# Altium PCB MainBoardPCB_4.PcbDoc (part 30 of 32)
Units mm, origin at the board's own origin, x right, y up, seen from the top; angles counter-clockwise.
Board outline 333.63 x 349.38 mm, 16 copper layers (L1, L2 (GND), L3 (Sign), L4 (GND), L5 (Sign), L6 (PWR/GND), L7(PWR/GND), L8 (Plane_GND), L9 (PWR/GND), L10 (PWR/GND), L11 (PWR/GND), L12 (Sign), L13 (GND), L14 (Sign), L15 (GND), L16), stack 2.502 mm thick; 2205 components, 1648 nets, 8314 pads, 3172 vias.
Unrouted connection lines stored in the file: 5141.
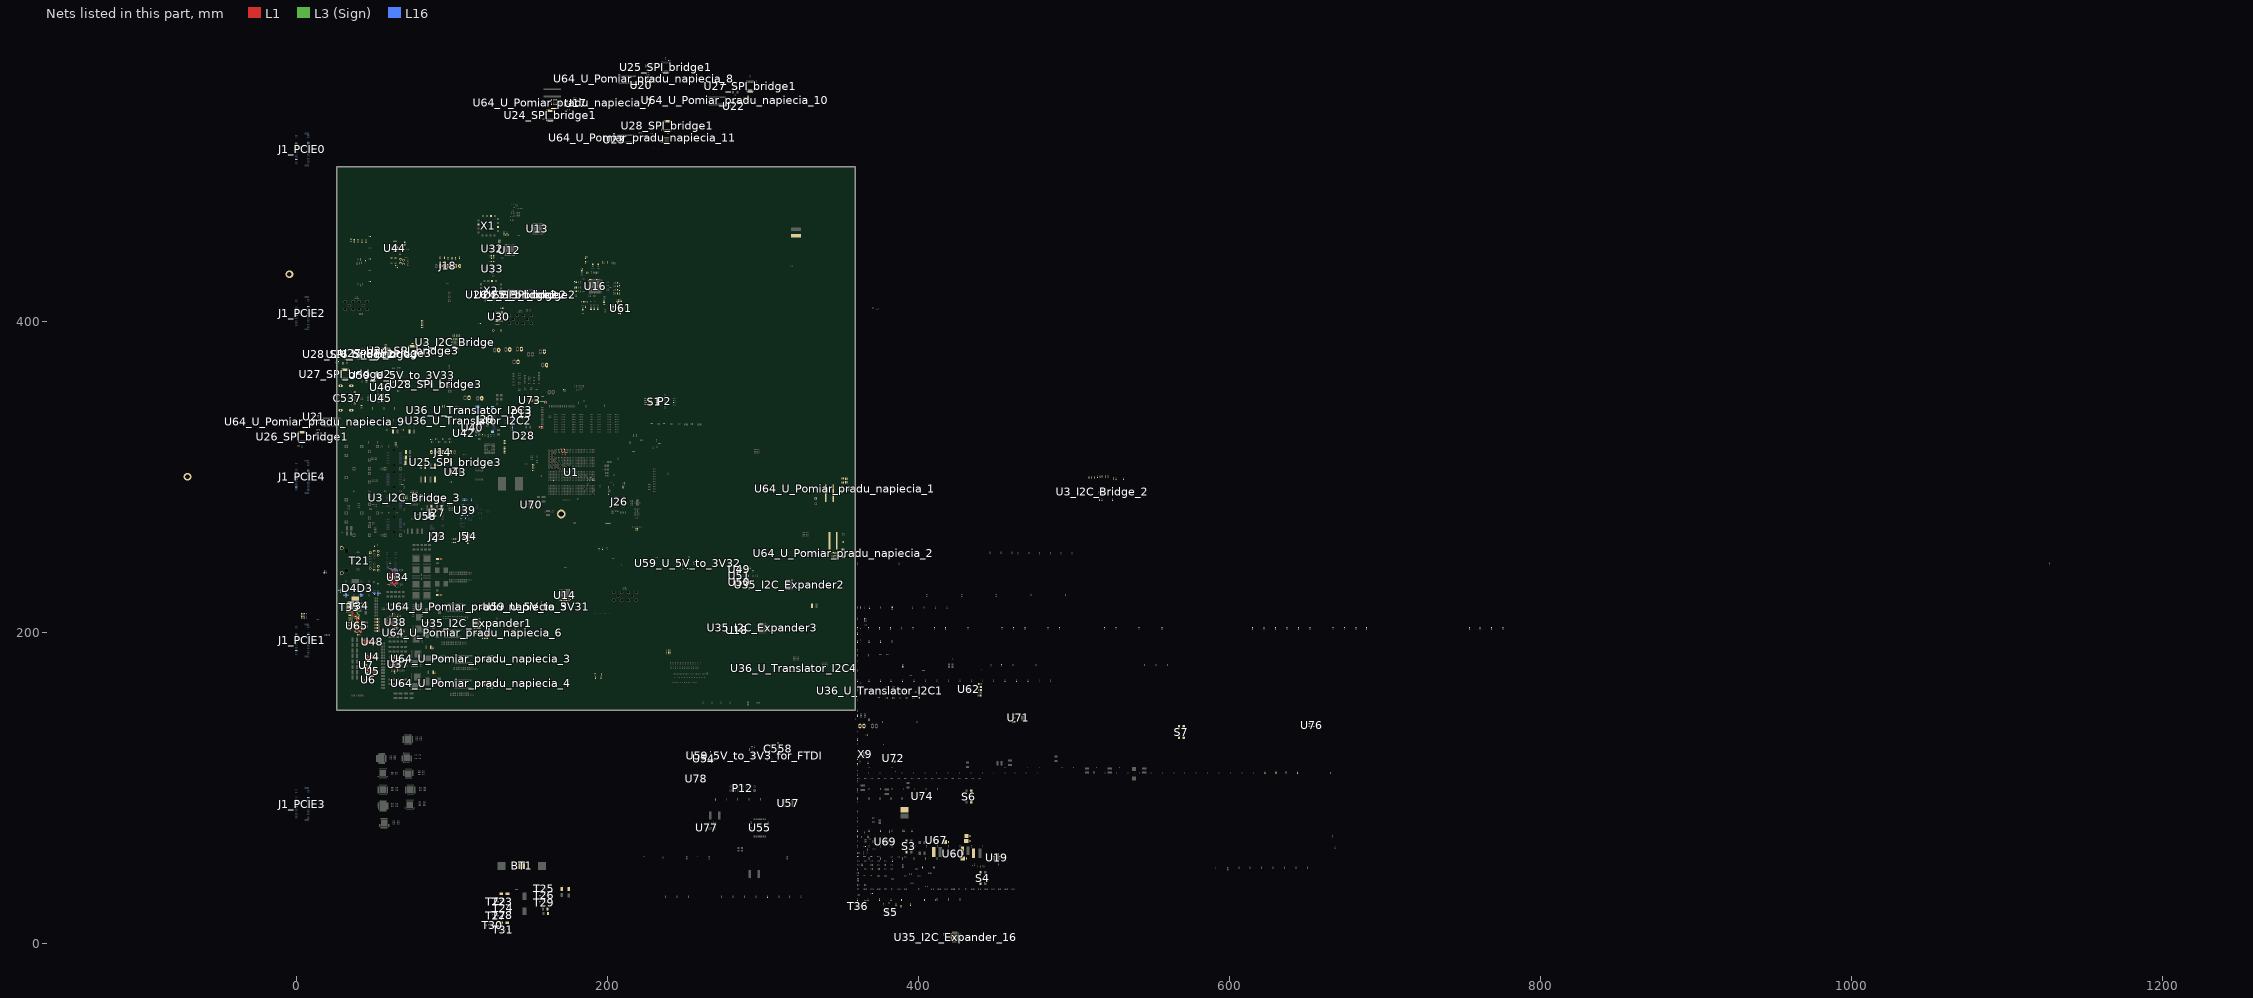
[diagram p30: the nets of this part, all layers, seen from the top]

## Via types
v1: diameter 0.5, hole 0.2, L1 to L16, tented both sides, 1153 vias
v2: diameter 0.5/0.35/0.35/0.35/0.35/0.35/0.35/0.35/0.35/0.35/0.35/0.35/0.35/0.35/0.35/0.5 (per signal layer), hole 0.2, L1 to L16, tented both sides, 548 vias
v3: diameter 0.5, hole 0.2, L1 to L16, 522 vias
v4: diameter 0.5/0.35/0.35/0.35/0.35/0.35/0.35/0.35/0.35/0.35/0.35/0.35/0.35/0.35/0.35/0.5 (per signal layer), hole 0.15, L1 to L16, tented both sides, 266 vias
v5: diameter 0.8, hole 0.4, L1 to L16, tented both sides, 164 vias
v6: diameter 0.35/0/0.35 (per signal layer), hole 0.127, L1 to L3 (Sign), tented both sides, 132 vias
v7: diameter 2.54, hole 1.02, L1 to L16, 125 vias
v8: diameter 1.4, hole 0.5, L1 to L16, tented both sides, 80 vias
v9: diameter 0.35, hole 0.127, L1 to L2 (GND), tented both sides, 36 vias
v10: diameter 0.4, hole 0.2, L1 to L16, 16 vias
v11: diameter 0.25, hole 0.2, L1 to L16, 16 vias
v12: diameter 5, hole 3, L1 to L16, 15 vias
v13: diameter 0.3, hole 0.2, L1 to L16, 15 vias
v14: diameter 0.45, hole 0.15, L1 to L16, 12 vias
v15: diameter 0.5/0.35/0.35/0.35/0.35/0.35/0.35/0.35/0.35/0.35/0.35/0.35/0.35/0.35/0.35/0.45 (per signal layer), hole 0.15, L1 to L16, tented both sides, 10 vias
v16: diameter 0.2/0/0.2 (per signal layer), hole 0.1, L1 to L3 (Sign), tented both sides, 9 vias
v17: diameter 0.4, hole 0.1, L1 to L16, 7 vias
v18: diameter 0.5, hole 0.2, L3 (Sign) to L6 (PWR/GND), tented both sides, 6 vias
v19: diameter 1.65, hole 1.65, L1 to L16, 6 vias
v20: diameter 1.15, hole 1.15, L1 to L16, 6 vias
v21: diameter 0.35/0/0.35 (per signal layer), hole 0.127, L14 (Sign) to L16, tented both sides, 5 vias
v22: diameter 0.2, hole 0.1, L1 to L16, 4 vias
v23: diameter 0.4, hole 0.2, L1 to L16, tented both sides, 2 vias
v24: diameter 0.4, hole 0.15, L1 to L16, 2 vias
v25: diameter 0.508, hole 0.127, L1 to L2 (GND), 2 vias
v26: diameter 0.508, hole 0.127, L2 (GND) to L3 (Sign), 2 vias
v27: diameter 0.5/0.35/0.35/0.35/0.35/0.35/0.35/0.35/0.35/0.35/0.35/0.35/0.35/0.35/0.35/0.5 (per signal layer), hole 0.15, L1 to L16, 2 vias
v28: diameter 0.35, hole 0.127, L3 (Sign) to L6 (PWR/GND), tented both sides, 2 vias
v29: diameter 5.5, hole 3.5, L1 to L16, 1 vias
v30: diameter 0.5/0.35/0.35/0.35/0.35/0.35/0.35/0.35/0.35/0.35/0.35/0.35/0.35/0.35/0.35/0.5 (per signal layer), hole 0.2, L1 to L16, 1 vias
v31: diameter 0.35/0.35/0.35 (per signal layer), hole 0.127, L1 to L3 (Sign), tented both sides, 1 vias
v32: diameter 0.45/0/0.45 (per signal layer), hole 0.15, L1 to L3 (Sign), tented both sides, 1 vias
v33: diameter 0.45/0/0.45 (per signal layer), hole 0.2, L14 (Sign) to L16, tented both sides, 1 vias
v34: diameter 0.35, hole 0.127, L2 (GND) to L3 (Sign), 1 vias
v35: diameter 0.35, hole 0.127, L1 to L2 (GND), 1 vias

## Nets (pads, with @x,y where several pads share a name; then routed paths per layer and width w, separated by ;. In a path a pad name is that pad's centre, name@x,y a point inside that pad or via, vN(x,y) a via of type N, cw(c..) or ccw(c..) an arc to the next point about the centre after c; other vN are vias at no path point) (continued)
Interrupt20: R735.2 U1.AD5 U64_U_Pomiar_pradu_napiecia_11.3
  other v2: 185.397,292.539
LED_0: R329.1 U39.47
LED_0_RJ: R329.2 T21.17
LED_1: R330.1 U39.46
LED_1_RJ: R330.2 T21.18
LED_2: R331.1 U39.45
LED_2_RJ: R331.2 T21.19
LED_3: R332.2 U39.39
LED_3_RJ: R332.1 T21.20
Logic_Out_KEY: R649.2 T26.3
LTC6952_1_CP_Out: C46.2 R77.2 U12.43 X1.2
LTC6952_1_REF_N: C53.1 R81.2 U12.46
LTC6952_1_REF_P: C54.1 R81.1 U12.45
LTC6952_1_Temp: R607.2 U12.49
LTC6952_1_VCO_N: C334.2 R532.2 U12.38
LTC6952_1_VCO_P: R533.1 U12.37
LTC6952_2_REF_N: C42.2 U13.46
LTC6952_2_REF_P: C41.2 U13.45
LTC6952_2_REF_SMA_N: C42.1 J3.2 R75.1
LTC6952_2_REF_SMA_P: C41.1 J2.2 R75.2
LTC6952_2_Temp: R736.2 U13.49
LTC6952_3_REF_N: C44.2 U14.46
LTC6952_3_REF_P: C43.2 U14.45
LTC6952_3_REF_SMA_N: C44.1 J5.2 R76.1
LTC6952_3_REF_SMA_P: C43.1 J4.2 R76.2
LTC6952_3_Temp: R765.2 U14.49
MDC: U39.16
MDIO: R333.2 U39.17
MIO_0: R768.2 U1.H17
  other v2: 169.397,304.539
MIO_1: R769.2
MIO_2: R770.2 U1.A20
  other v2: 162.397,307.539
MIO_3: R771.2 U1.D19
  other v2: 165.397,306.539
MIO_4: R772.2 U1.J17
  other v2: 170.397,304.539
MIO_5: R773.2 U1.C19
  other v2: 164.397,306.539
MIO_6: R774.2 U1.D20
  other v2: 165.397,307.539
MIO_7: R775.2 U1.E19
  other v2: 166.397,306.539
MIO_8: R776.2 U1.E20
  other v2: 166.397,307.539
MIO_9: R777.2 U1.F20
  other v2: 167.397,307.539
MIO_10: R778.2 U1.F18
  other v2: 167.397,305.539
MIO_11: R779.2 U1.G18
  other v2: 168.397,305.539
MIO_12: R780.2 U1.H18
  other v2: 169.397,305.539
MIO_13: R87.1 U1.G19
  other v2: 168.397,306.539
MIO_14: R88.1 U1.E18
  other v2: 166.397,305.539
MIO_15: R89.1 U1.J19
  other v2: 170.397,306.539
MIO_16: R90.1 U1.K17
  other v2: 171.397,304.539
MIO_17: R91.1 U1.C18
  other v2: 164.397,305.539
MIO_18: R92.1 U1.K18
  other v2: 171.397,305.539
MIO_19: R93.1 U1.K16
  other v2: 171.397,303.539
MIO_20: R94.1
MIO_21: R95.1 U1.H19
  other v2: 169.397,306.539
MIO_22: R96.1 U1.F17
  other v2: 167.397,304.539
MIO_23: R781.2 U1.K19
  other v2: 171.397,306.539
MIO_24: R782.2 U1.A18
  other v2: 162.397,305.539
MIO_25: R783.2 U1.B18
  other v2: 163.397,305.539
MIO_26: R784.2 U1.B20
  other v2: 163.397,307.539
MIO_27: R785.2 U1.B21
  other v2: 163.397,308.539
MIO_28: R786.2 U1.A21
  other v2: 162.397,308.539
MIO_29: R787.2 U1.D21
  other v2: 165.397,308.539
MIO_30: R788.2 U1.C21
  other v2: 164.397,308.539
MIO_31: R789.2 U1.A22
  other v2: 162.397,309.539
MIO_32: R790.2 U1.G20
  other v2: 168.397,307.539
MIO_33: R791.2 U1.C22
  other v2: 164.397,309.539
MIO_34: R792.2 U1.B24
  other v2: 163.397,311.539
MIO_35: R793.2 U1.B23
  other v2: 163.397,310.539
MIO_36: R794.2 U1.D22
  other v2: 165.397,309.539
MIO_37: R795.2 U1.F21
  other v2: 167.397,308.539
MIO_38: R796.2 U1.C23
  other v2: 164.397,310.539
MIO_39: R101.1 U1.E22
  other v2: 166.397,309.539
MIO_40: R102.1 U1.C24
  other v2: 164.397,311.539
MIO_41: R103.1 U1.D24
  other v2: 165.397,311.539
MIO_42: R104.1 U1.E23
  other v2: 166.397,310.539
MIO_43: R797.2 U1.F22
  other v2: 167.397,309.539
MIO_44: R798.2 U1.E24
  other v2: 166.397,311.539
MIO_45: R799.2 U1.F23
  other v2: 167.397,310.539
MIO_46: R105.1 U1.K20
  other v2: 171.397,307.539
MIO_47: R107.1 U1.K21
  other v2: 171.397,308.539
MIO_48: R108.1 U1.J21
  other v2: 170.397,308.539
MIO_49: R110.1 U1.G21
  other v2: 168.397,308.539
MIO_50: R111.1 U1.J20
  other v2: 170.397,307.539
MIO_51: R112.1 U1.H21
  other v2: 169.397,308.539
MIO_52: R362.1 U1.A24
  other v2: 162.397,311.539
MIO_53: R800.2 U1.B25
  other v2: 163.397,312.539
MIO_54: R115.1 U1.A23
  other v2: 162.397,310.539
MIO_55: R801.2 U1.B26
  other v2: 163.397,313.539
MIO_56: R116.1 U1.A25
  other v2: 162.397,312.539
MIO_57: R117.1 U1.A26
  other v2: 162.397,313.539
MIO_58: R118.1 U1.A28
  other v2: 162.397,315.539
MIO_59: R119.1 U1.A27
  other v2: 162.397,314.539
MIO_60: R120.1 U1.C26
  other v2: 164.397,313.539
MIO_61: R121.1 U1.B29
  other v2: 163.397,316.539
MIO_62: R122.1 U1.B28
  other v2: 163.397,315.539
MIO_63: R802.2 U1.A29
  other v2: 162.397,316.539
MIO_64: R803.2 U1.B30
  other v2: 163.397,317.539
MIO_65: R804.2 U1.D25
  other v2: 165.397,312.539
MIO_66: R805.2 U1.C27
  other v2: 164.397,314.539
MIO_67: R806.2 U1.C28
  other v2: 164.397,315.539
MIO_68: R807.2 U1.C29
  other v2: 164.397,316.539
MIO_69: R808.2 U1.D27
  other v2: 165.397,314.539
MIO_70: R809.2 U1.D26
  other v2: 165.397,313.539
MIO_71: R810.2 U1.D30
  other v2: 165.397,317.539
MIO_72: R811.2 U1.E27
  other v2: 166.397,314.539
MIO_73: R812.2 U1.E30
  other v2: 166.397,317.539
MIO_74: R813.2 U1.E29
  other v2: 166.397,316.539
MIO_75: R814.2 U1.D29
  other v2: 165.397,316.539
MIO_76: R815.2 U1.E28
  other v2: 166.397,315.539
MIO_77: R816.2 U1.E25
  other v2: 166.397,312.539
MIO_GPIO_0_12: J15.2 R780.1
MIO_GPIO_0_23: J16.2 R98.1 R781.1
MIO_GPIO_1_38: J17.2 R796.1
MIO_GPIO_2_66: J19.2 R805.1
MIO_GPIO_2_70: J20.2 R809.1
MIO_GPIO_2_73: J22.2 R812.1
MIO_GPIO_2_74: J23.2 R813.1 U36_U_Translator_I2C2.8
MIO_GPIO_2_75: J24.2 R814.1 U36_U_Translator_I2C3.8
MODE: R669.2 R670.1 U65.2 | length 3.6
  L1 w0.254: R670.1@37.668,200.838 38.26,200.838 ; U65.2@38.26,202.478 38.26,200.838 ; R669.2@38.887,199.931 38.537,199.931 38.26,200.208 38.26,200.838
NetBT1_2: BT1.2 R650.1 T22.2
NetC36_1: C36.1 R52.2 R54.2 | length 3.4
  L1 w0.5: R52.2@157.837,331.433 156.878,331.433 C36.1@156.346,331.965 156.903,332.522 R54.2@157.837,332.522
NetC45_2: C45.2 R77.1
NetC78_2: C78.2 U16.7
NetC79_2: C79.2 U16.38
NetC80_2: C80.2 U16.48
NetC91_1: C91.1 U16.39
NetC96_1: C96.1 U16.47
NetC207_2: C207.2 C208.1 L3.2
NetC209_2: C209.2 C210.1 L4.2
NetC211_2: C211.2 C212.1 L5.2
NetC213_2: C213.2 C214.1 L6.2
NetC215_2: C215.2 C216.1 L7.2
NetC217_2: C217.2 C218.1 L8.2
NetC277_2: C277.2
NetC278_2: C278.2
NetC289_2: C289.2
NetC290_2: C290.2
NetC301_2: C301.2
NetC302_2: C302.2
NetC320_1: C320.1 U30.9
NetC321_1: C321.1 U30.10
NetC322_2: C322.2 U30.3 X3.1
NetC323_2: C323.2 U30.2 X3.2
NetC334_1: C334.1 X1.10
NetC335_2: C335.2 R532.1 R533.2
NetC341_1: C341.1 J26.1
NetC351_2: C351.2 R268.2 U34.3 | length 4.2
  L1 w0.254: R268.2@59.692,237.714 60.97,237.714 61.118,237.565 61.118,236.791 C351.2@61.146,236.764 61.151,236.764 61.776,236.139 U34.3@62.822,236.139
NetC356_2: C356.2 R272.2 R277.1 R278.1 U34.2 U34.4 U34.7 U34.9 U34.32 | length 23.6
  L1 w0.254: U34.4@62.822,235.639 61.694,235.639 61.667,235.666 60.285,235.666 60.109,235.49 60.109,235.185 R272.2@60.156,235.139 60.206,235.139 60.479,234.866 60.479,234.745 60.783,234.441 60.783,233.982 60.926,233.839 C356.2@60.931,233.839 61.589,233.839 61.99,233.437 v17(62.009,233.437) 62.049,233.437 62.347,233.139 U34.9@63.322,233.139 ; U34.2@62.822,236.639 62.481,236.639 62.057,237.063 62.057,237.421 v17@62.125,237.489 ; U34.32@63.322,237.639 63.322,237.703 63.32,237.705 62.341,237.705 v17@62.125,237.489 ; R278.1@63.439,240.856 63.077,240.856 62.085,239.863 62.085,237.528 v17@62.125,237.489
  L16 w0.254: v17(62.085,237.489) 62.085,237.449 62.009,237.373 v17(62.009,233.437) 62.009,231.673 v22(64.365,229.317)
NetC357_2: C357.2 U34.13 U34.28 | length 10.4
  L1 w0.254: v22(64.511,231.163) 64.583,231.235 64.816,231.235 65.315,231.734 65.315,232.984 65.32,232.989 65.32,233.137 U34.13@65.322,233.139 ; U34.28@65.322,237.639 v17(65.322,238.22)
  L16 w0.254: v22(64.511,231.163) 64.949,231.601 64.949,237.847 v17(65.322,238.22)
NetC471_2: C471.2 T21.12
NetC472_2: C472.2 T21.6
NetC473_2: C473.2 T21.1
NetC474_2: C474.2 T21.7
NetC475_2: T21.S1
NetC476_2: T21.S2
NetC532_1: C532.1 U44.14
NetC533_1: C533.1 U44.15
NetC534_1: C534.1 U44.16
NetC537_1: C537.1 FB26.2
NetC537_4: C537.4 FB27.2
NetC537_Z1: C537.Z1 FB28.1
NetC549_2: C549.2 R687.1 | length 1.1
  L1 w0.254: C549.2@61.948,212.229 61.951,212.227 61.951,211.171 R687.1@61.953,211.169
NetC558_Z1: C558.Z1 C558.Z2
NetC568_2: C568.2 FB33.1 R433.2 U60.10 U60.11 U60.12 U60.13 U60.14
NetC571_1: C571.1 U60.7
NetC573_1: C573.1 R436.1 R437.2 U61.16
NetC577_1: C577.1 R438.1 R439.2 U61.10
NetC578_2: C578.2 U61.7
NetC579_2: C579.2 U61.19
NetC581_2: C581.2 C582.2 C583.2 FB34.2 R442.2 U62.1 U62.2 U62.3
NetC584_2: C584.2 R445.2 U62.7
NetC588_1: C588.1 R543.2
NetC588_2: C588.2 C589.1 R545.2
NetC591_2: C591.2 C592.2 FB37.2 X9.4
NetC597_2: C597.2 R140.1 U65.17 | length 3.4
  L1 w0.254: C597.2@34.722,206.35 34.722,205.41 R140.1@34.747,205.384 35.433,205.384 36,204.818 U65.17@36.92,204.818
NetC603_1: C603.1 R113.1 R114.2 U19.20
NetC604_1: C604.1 U19.25
NetC605_1: C605.1 R212.1 R214.2 U19.21
NetC612_1: C612.1 R216.2 R218.2 U19.22
NetC616_1: C616.1 R220.1 R274.2 U19.19
NetC633_2: C633.2 R613.1 | length 2.3
  L1 w0.254: R613.1@90.765,247.284 C633.2@93.052,247.284
NetC634_2: C634.2 R615.2 U34.11 U34.30 | length 14.8
  L1 w0.254: v17(61.056,231.693) 63.519,231.693 64.315,232.489 64.315,232.984 64.32,232.989 64.32,233.137 U34.11@64.322,233.139 ; v17(64.297,238.715) 64.32,238.692 U34.30@64.322,237.639 U34.30@64.322,237.639
  L16 w0.254: v17(61.056,231.693) R615.2@61.056,234.739 61.042,234.753 61.042,235.71 C634.2@61.028,235.724 61.028,235.729 61.301,236.002 61.392,236.002 61.525,236.135 61.525,237.705 62.535,238.715 v17(64.297,238.715)
NetC635_2: C635.2 R615.1 | length 1
  L16 w0.254: C635.2@60.062,235.724 60.109,235.677 60.109,234.785 R615.1@60.156,234.739
NetC636_2: C636.2 R616.1 | length 2.2
  L1 w0.254: R616.1@90.717,224.031 C636.2@92.942,224.031
NetC637_2: C637.2 R288.1 | length 1
  L1 w0.254: 87.033,189.468 87.568,189.468 C637.2@87.909,189.81
NetC638_2: C638.2 R298.1 | length 1.1
  L1 w0.254: 88.405,173.59 88.411,173.596 88.938,173.596 C638.2@89.332,173.99
NetC643_2: C643.2 R623.1 | length 1.1
  L1 w0.254: C643.2@63.12,173.949 R623.1@63.12,175.007
NetC644_2: C644.2 R624.1 | length 1
  L1 w0.254: R624.1@63.175,184.21 C644.2@63.175,185.176
NetC645_2: C645.2 R306.1 | length 0.9
  L1 w0.254: 87.566,203.543 87.564,203.54 87.564,203.257 C645.2@87.964,202.857
NetC646_2: C646.2 R316.1 | length 1.1
  L1 w0.254: C646.2@84.502,207.488 85.052,206.938 85.052,206.654
NetC649_2: C649.2
NetC651_2: C651.2
NetC652_2: C652.2 R631.1
NetC653_2: C653.2
NetC655_1: C655.1 U49.6
NetC656_1: C656.1 U50.6
NetC657_1: C657.1 U51.6
NetC674_2: C674.2 FB45.1 R644.2 U69.10 U69.11 U69.12 U69.13 U69.14
NetC677_2: C677.2
NetC678_2: C678.2 R652.2 R654.2 T25.1 T29.3
NetC679_2: C679.2 D22.1 D23.1
NetC680_2: C680.2 R656.1 R657.1 T30.1
NetC693_1: C693.1 L22.1 T34.1 T34.2 T34.3 T35.5 U65.12 | length 3.2
  L1 w0.254: U65.12@39.26,206.158 39.26,207.104 39.98,207.823 C693.1@39.98,209.037
NetC693_2: C693.2 D26.1 R665.1 | length 6.9
  L1 w0.254: R665.1@39.014,209.828 39.025,209.817 C693.2@39.98,209.817
  L1 w0.5: D26.1@34.353,210.921 35.856,210.921 36.25,211.315 38.427,211.315 39.014,210.728 R665.1@39.014,209.828
NetC701_1: C701.1 R667.2 | length 2.9
  L1 w0.254: C701.1@41.097,200.121 41.676,200.121 42.078,200.524 R667.2@42.078,202.265
NetC701_2: C701.2 C702.2 U65.5 | length 2.7
  L1 w0.254: U65.5@39.76,202.478 39.76,201.311 C702.2@40.17,200.901 C701.2@41.097,200.901
NetC703_2: C703.2 U65.7 | length 1.7
  L1 w0.254: U65.7@40.6,203.818 41.292,203.818 41.38,203.73 41.759,203.73 C703.2@42.127,204.097
NetC706_1: C706.1 R671.1 R672.2 U70.16
NetC710_1: C710.1 R673.1 R674.2 U70.10
NetC711_2: C711.2 U70.7
NetC712_2: C712.2 U70.19
NetC713_2: C713.2 U71.3 X1.14
NetC715_2: C715.2
NetC716_2: C716.2
NetC717_2: C717.2
NetC718_2: C718.2
NetC719_2: C719.2 U69.7
NetC724_1: C724.1 R384.1
NetC725_1: C725.1 R385.1
NetC726_1: C726.1 R484.1
  other v29: 170.471,276.121
NetC727_1: C727.1 R485.1
NetC790_1: C790.1 U76.3
NetD5_1: D5.1 R716.1
NetD5_2: D5.2 U43.14
NetD6_1: D6.1 R717.1
NetD6_2: D6.2 U43.13
NetD7_1: D7.1 R718.1
NetD7_2: D7.2 D9.2 U43.12
NetD8_1: D8.1 R719.1
NetD8_2: D8.2 U43.11
NetD9_1: D9.1 R720.1
NetD10_1: D10.1 R368.1
NetD10_2: D10.2 U44.12
NetD11_2: D11.2 R370.1 S4.1 S4.2 U44.7
NetD12_2: D12.2 R369.1 S3.1 S3.2 U44.6
NetD16_1: D16.1 L13.1 U19.5
NetD16_2: D16.2 U19.6
NetD17_1: D17.1 L16.1 U19.4
NetD17_2: D17.2 U19.3
NetD18_1: D18.1 L17.1 U19.2
NetD18_2: D18.2 U19.1
NetD19_1: D19.1 L18.1 U19.7
NetD19_2: D19.2 U19.8
NetD20_1: D20.1 D21.1 R647.1
NetD20_2: D20.2 T23.3
NetD21_2: D21.2 T27.3
NetD28_2: D28.2 R276.2
NetFB29_2: FB29.2 J28.10 J28.11 J28.12 J28.13
NetJ30_1: J30.1 R283.2
NetJ30_2: J30.2 R286.2
NetL15_2: L15.2 U19.24
NetP3_1: P3.1 U44.11
NetP4_2: P4.2 U44.10
NetP12_13: P12.13 R730.1 U78.1
NetP13_1: P13.1 R675.2
NetP13_3: P13.3 R737.1
NetR3_I2C_Bridge_1: R3_I2C_Bridge.1 U3_I2C_Bridge.17
NetR3_I2C_Bridge_2_1: R3_I2C_Bridge_2.1 U3_I2C_Bridge_2.17
NetR3_I2C_Bridge_3_1: R3_I2C_Bridge_3.1 R176.1 R180.1 R185.1 R189.1 R194.1 R198.1 R203.1 R207.1 R213.1 R221.1 R538.1 U3_I2C_Bridge.19 U3_I2C_Bridge_3.17 U58.13 U64_U_Pomiar_pradu_napiecia_7.5 U64_U_Pomiar_pradu_napiecia_8.5 U64_U_Pomiar_pradu_napiecia_9.5 U64_U_Pomiar_pradu_napiecia_10.5 U64_U_Pomiar_pradu_napiecia_11.5
NetR4_I2C_Bridge_1: R4_I2C_Bridge.1 U3_I2C_Bridge.16
NetR4_I2C_Bridge_2_1: R4_I2C_Bridge_2.1 U3_I2C_Bridge_2.16
NetR4_I2C_Bridge_3_1: R4_I2C_Bridge_3.1 R177.1 R181.1 R186.1 R190.1 R195.1 R199.1 R204.1 R208.1 R215.1 R222.1 R427.1 U3_I2C_Bridge.20 U3_I2C_Bridge_3.16 U58.14 U64_U_Pomiar_pradu_napiecia_7.4 U64_U_Pomiar_pradu_napiecia_8.4 U64_U_Pomiar_pradu_napiecia_9.4 U64_U_Pomiar_pradu_napiecia_10.4 U64_U_Pomiar_pradu_napiecia_11.4
NetR5_I2C_Bridge_1: R5_I2C_Bridge.1 U3_I2C_Bridge.15
NetR5_I2C_Bridge_2_1: R5_I2C_Bridge_2.1 U3_I2C_Bridge_2.15
NetR5_I2C_Bridge_3_1: R5_I2C_Bridge_3.1 U3_I2C_Bridge_3.15 U35_I2C_Expander3.8
NetR6_I2C_Bridge_1: R6_I2C_Bridge.1 U3_I2C_Bridge.14
NetR6_I2C_Bridge_2_1: R6_I2C_Bridge_2.1 U3_I2C_Bridge_2.14
NetR6_I2C_Bridge_3_1: R6_I2C_Bridge_3.1 U3_I2C_Bridge_3.14 U35_I2C_Expander3.9
NetR7_I2C_Bridge_1: R7_I2C_Bridge.1 U3_I2C_Bridge.13
NetR7_I2C_Bridge_2_1: R7_I2C_Bridge_2.1 U3_I2C_Bridge_2.13
NetR7_I2C_Bridge_3_1: R7_I2C_Bridge_3.1 R130.1 U3_I2C_Bridge_3.13
NetR8_I2C_Bridge_1: R8_I2C_Bridge.1 U3_I2C_Bridge.12
NetR8_I2C_Bridge_2_1: R8_I2C_Bridge_2.1 U3_I2C_Bridge_2.12
NetR8_I2C_Bridge_3_1: R8_I2C_Bridge_3.1 R131.1 U3_I2C_Bridge_3.12
NetR9_I2C_Bridge_2_1: R9_I2C_Bridge_2.1 U3_I2C_Bridge_2.11
NetR9_I2C_Bridge_3_1: R9_I2C_Bridge_3.1 R22.1 R389.1 R457.1 R465.1 R563.1 R567.1 R571.1 R575.1 R579.1 R583.1 R587.1 R591.1 R593.1 R597.1 U3_I2C_Bridge_3.11 U35_I2C_Expander1.8 U35_I2C_Expander2.8 U64_U_Pomiar_pradu_napiecia_1.5 U64_U_Pomiar_pradu_napiecia_2.5 U64_U_Pomiar_pradu_napiecia_3.5 U64_U_Pomiar_pradu_napiecia_4.5 U64_U_Pomiar_pradu_napiecia_5.5 U64_U_Pomiar_pradu_napiecia_6.5 U72.5
NetR10_I2C_Bridge_2_1: R10_I2C_Bridge_2.1 U3_I2C_Bridge_2.10
NetR10_I2C_Bridge_3_1: R10_I2C_Bridge_3.1 R24.1 R390.1 R459.1 R466.1 R564.1 R568.1 R572.1 R576.1 R580.1 R584.1 R588.1 R592.1 R594.1 R598.1 U3_I2C_Bridge_3.10 U35_I2C_Expander1.9 U35_I2C_Expander2.9 U64_U_Pomiar_pradu_napiecia_1.4 U64_U_Pomiar_pradu_napiecia_2.4 U64_U_Pomiar_pradu_napiecia_3.4 U64_U_Pomiar_pradu_napiecia_4.4 U64_U_Pomiar_pradu_napiecia_5.4 U64_U_Pomiar_pradu_napiecia_6.4 U72.4
NetR12_1: R12.1 R19.2 U5.5 | length 4.2
  L1 w0.2: R19.2@44.801,174.289 R12.1@45.844,174.289 45.844,174.314 46.28,174.75 U5.5@47.56,174.75 46.345,174.75
NetR14_2: R14.2 R16.2 R22.2 R24.2 U72.2
NetR15_1: R15.1 R23.2 U4.5 | length 2.9
  L1 w0.2: R23.2@44.92,183.563 R15.1@45.94,183.563 45.94,183.667 46.345,184.071 U4.5@47.56,184.071
NetR17_1: R17.1 R25.2 U4.4 | length 2.9
  L1 w0.2: R25.2@44.92,185.074 R17.1@45.94,185.074 45.94,184.98 46.349,184.571 U4.4@47.56,184.571
NetR18_2: R18.2 U4.10 | length 1.4
  L1 w0.2: U4.10@49.86,184.071 50.307,184.071 50.707,184.471 R18.2@51.11,184.471
NetR20_1: R20.1 R26.2 U5.4 | length 4.2
  L1 w0.2: R26.2@44.801,175.686 R20.1@45.822,175.686 46.258,175.25 U5.4@47.56,175.25 46.349,175.25
NetR21_2: R21.2 U5.10 | length 1.9
  L1 w0.2: U5.10@49.86,174.75 50.762,174.75 51.138,175.125 R21.2@51.6,175.125
NetR27_2: R27.2 U6.C1
NetR28_2: R28.2 U7.C1
NetR149_1: R149.1 R159.2 U65.20 | length 2.2
  L1 w0.254: R159.2@34.773,203.149 35.891,203.149 36.059,203.318 U65.20@36.92,203.318
NetR150_1: R150.1 R160.2 U65.6 | length 8.3
  L1 w0.254: U65.6@40.6,203.318 41.282,203.318 ; v6(41.123,202.654) 41.282,202.814 41.282,203.318 ; R160.2@42.078,203.203 41.397,203.203 41.282,203.318 ; R150.1@42.202,206.468 v6(42.202,207.35)
  L3 (Sign) w0.254: v6(41.123,202.654) 42.202,203.733 v6(42.202,207.35)
NetR174_2: R174.2 R175.2 R176.2 R177.2 U64_U_Pomiar_pradu_napiecia_7.2
NetR178_2: R178.2 R179.2 R180.2 R181.2 U64_U_Pomiar_pradu_napiecia_7.1
NetR182_2: R182.2 U17.C1
NetR183_2: R183.2 R184.2 R185.2 R186.2 U64_U_Pomiar_pradu_napiecia_8.2
NetR187_2: R187.2 R188.2 R189.2 R190.2 U64_U_Pomiar_pradu_napiecia_8.1
NetR191_2: R191.2 U20.C1
NetR192_2: R192.2 R193.2 R194.2 R195.2 U64_U_Pomiar_pradu_napiecia_9.2
NetR196_2: R196.2 R197.2 R198.2 R199.2 U64_U_Pomiar_pradu_napiecia_9.1
NetR200_2: R200.2 U21.C1
NetR201_2: R201.2 R202.2 R203.2 R204.2 U64_U_Pomiar_pradu_napiecia_10.2
NetR205_2: R205.2 R206.2 R207.2 R208.2 U64_U_Pomiar_pradu_napiecia_10.1
NetR209_2: R209.2 U22.C1
NetR210_2: R210.2 R211.2 R213.2 R215.2 U64_U_Pomiar_pradu_napiecia_11.2
NetR217_2: R217.2 R219.2 R221.2 R222.2 U64_U_Pomiar_pradu_napiecia_11.1
NetR223_I2C_Bridge_2_1: R223_I2C_Bridge_2.1 U3_I2C_Bridge_2.8
NetR224_I2C_Bridge_2_1: R224_I2C_Bridge_2.1 U3_I2C_Bridge_2.7
NetR225_I2C_Bridge_2_1: R225_I2C_Bridge_2.1 U3_I2C_Bridge_2.6
NetR226_I2C_Bridge_2_1: R226_I2C_Bridge_2.1 U3_I2C_Bridge_2.5
NetR227_I2C_Bridge_2_1: R227_I2C_Bridge_2.1 U3_I2C_Bridge_2.4 U35_I2C_Expander_16.8
NetR228_2: R228.2 U23.C1
NetR229_2: R229.2 R230.2 R457.2 R459.2 U64_U_Pomiar_pradu_napiecia_1.2
NetR231_SPI_bridge3_1: R231_SPI_bridge3.1 U24_SPI_bridge3.11
NetR231_SPI_bridge3_2: R231_SPI_bridge3.2 U24_SPI_bridge3.15
NetR232_SPI_bridge1_2: R232_SPI_bridge1.2 U24_SPI_bridge1.9
NetR232_SPI_bridge2_2: R232_SPI_bridge2.2 U24_SPI_bridge2.9
NetR232_SPI_bridge3_2: R232_SPI_bridge3.2 U24_SPI_bridge3.9
NetR233_SPI_bridge3_1: R233_SPI_bridge3.1 U24_SPI_bridge1.6 U25_SPI_bridge1.6 U25_SPI_bridge3.11 U26_SPI_bridge1.6 U27_SPI_bridge1.6 U28_SPI_bridge1.6
NetR234_SPI_bridge1_2: R234_SPI_bridge1.2 U25_SPI_bridge1.9
NetR234_SPI_bridge2_2: R234_SPI_bridge2.2 U25_SPI_bridge2.9
NetR234_SPI_bridge3_2: R234_SPI_bridge3.2 U25_SPI_bridge3.9
NetR235_SPI_bridge1_1: R235_SPI_bridge1.1 U26_SPI_bridge1.9
NetR235_SPI_bridge2_1: R235_SPI_bridge2.1 U26_SPI_bridge2.9
NetR235_SPI_bridge3_1: R235_SPI_bridge3.1 U26_SPI_bridge3.9
NetR237_SPI_bridge1_1: R237_SPI_bridge1.1 U27_SPI_bridge1.9
NetR237_SPI_bridge2_1: R237_SPI_bridge2.1 U27_SPI_bridge2.9
NetR237_SPI_bridge3_1: R237_SPI_bridge3.1 U27_SPI_bridge3.9
NetR238_SPI_bridge2_1: R238_SPI_bridge2.1 U27_SPI_bridge2.11
NetR238_SPI_bridge2_2: R238_SPI_bridge2.2 U27_SPI_bridge2.15
NetR238_SPI_bridge3_1: R238_SPI_bridge3.1 U27_SPI_bridge3.11
NetR238_SPI_bridge3_2: R238_SPI_bridge3.2 U27_SPI_bridge3.15
NetR239_SPI_bridge1_2: R239_SPI_bridge1.2 U28_SPI_bridge1.9
NetR239_SPI_bridge2_2: R239_SPI_bridge2.2 U28_SPI_bridge2.9
NetR239_SPI_bridge3_2: R239_SPI_bridge3.2 U28_SPI_bridge3.9
NetR240_SPI_bridge3_1: R240_SPI_bridge3.1 U28_SPI_bridge3.11
NetR240_SPI_bridge3_2: R240_SPI_bridge3.2 U28_SPI_bridge3.15
NetR241_1: R241.1 R242.1 U3_I2C_Bridge_2.22
NetR243_1: R243.1 R244.1 U3_I2C_Bridge_2.23
NetR263_2: R263.2 U33.16
NetR264_2: R264.2 U33.13
NetR265_2: R265.2 U33.15
NetR266_1: R266.1 R267.2 S5.1 S5.2 S5.3 S5.4
NetR269_2: R269.2 U18.C1
NetR272_1: R272.1 U34.5 | length 1.8
  L1 w0.254: R272.1@61.056,235.139 U34.5@62.822,235.139
NetR281_1: R281.1 R400.1 U3_I2C_Bridge_2.18
NetR284_2: R284.2 U19.17
NetR289_1: R289.1 U37.5 | length 1.4
  L1 w0.254: R289.1@61.781,179.317 U37.5@63.175,179.317
NetR293_2: R293.2 R294.2 U37.7 | length 2.4
  L1 w0.254: R294.2@61.781,177.317 R293.2@61.781,178.317 U37.7@63.175,178.317
NetR304_2: R304.2 R388.2 R389.2 R390.2 U72.1
NetR305_2: R305.2 U67.6
NetR307_1: R307.1 U38.5 | length 4.1
  L1 w0.254: R307.1@57.945,206.596 57.945,206.233 58.189,205.989 59.673,205.989 59.898,206.214 U38.5@61.453,206.214
NetR308_2: R308.2 U67.5
NetR309_2: R309.2 U67.4
NetR310_2: R310.2 R312.2 U38.7 | length 2.8
  L1 w0.254: R312.2@58.826,204.716 59.784,204.716 60.282,205.214 U38.7@61.453,205.214
NetR334_1: R334.1 U39.12
NetR339_1: R339.1 R341.2 U40.7
NetR342_1: R342.1 R344.2 U42.7
NetR358_1: R358.1 S1.8
NetR359_1: R359.1 S1.7
NetR360_1: R360.1 S1.6
NetR361_1: R361.1 S1.5
NetR366_2: R366.2 R498.1 R499.2 R692.2
NetR372_1: R372.1 R373.2 U44.2 U44.3
NetR379_2: R379.2 U45.24
NetR380_2: R380.2 U46.C1
NetR391_1: R391.1 R393.2 U49.7
  other v12: -69.975,300.045
NetR394_1: R394.1 R396.2 U50.7
NetR397_1: R397.1 R399.2 U51.7
NetR419_2: R419.2 R422.1 U54.1
NetR423_2: R423.2 U55.6
NetR424_2: R424.2 U55.14
NetR428_1: R428.1 U3_I2C_Bridge_2.20 U36_U_Translator_I2C1.5 U36_U_Translator_I2C2.5
  other v12: -4.475,430.276
NetR429_1: R429.1 U58.12
NetR430_5V_to_3V3_for_FTDI_1: R430_5V_to_3V3_for_FTDI.1 R432_5V_to_3V3_for_FTDI.2 U59_5V_to_3V3_for_FTDI.7
NetR430_U_5V_to_3V31_1: R430_U_5V_to_3V31.1 R432_U_5V_to_3V31.2 U59_U_5V_to_3V31.7
NetR430_U_5V_to_3V32_1: R430_U_5V_to_3V32.1 R432_U_5V_to_3V32.2 U59_U_5V_to_3V32.7
NetR430_U_5V_to_3V33_1: R430_U_5V_to_3V33.1 R432_U_5V_to_3V33.2 U59_U_5V_to_3V33.7
NetR431_5V_to_3V3_for_FTDI_1: R431_5V_to_3V3_for_FTDI.1 U59_5V_to_3V3_for_FTDI.5
NetR433_1: R433.1 R434.2 U60.9
NetR435_1: R435.1 R668.2 U69.4
NetR443_1: R443.1 R444.2 U62.6
NetR449_1: R449.1 R450.1 U3_I2C_Bridge.22
NetR451_1: R451.1 R452.1 U3_I2C_Bridge.23
NetR453_1: R453.1 R454.1 U3_I2C_Bridge.18
NetR455_1: R455.1 R456.1 U35_I2C_Expander1.13
NetR458_1: R458.1 R460.1 U35_I2C_Expander1.12
NetR461_2: R461.2 R463.2 R465.2 R466.2 U64_U_Pomiar_pradu_napiecia_1.1
NetR462_1: R462.1 R464.1 U35_I2C_Expander1.11
NetR467_2: R467.2 R468.2 R593.2 R594.2 U64_U_Pomiar_pradu_napiecia_2.2
NetR469_1: R469.1 R470.1 U3_I2C_Bridge_3.22
NetR471_1: R471.1 R472.1 U3_I2C_Bridge_3.23
NetR473_1: R473.1 R474.1 U3_I2C_Bridge_3.18
NetR475_1: R475.1 R476.1 U35_I2C_Expander3.13
NetR477_1: R477.1 R478.1 U35_I2C_Expander3.12
NetR479_1: R479.1 R480.1 U35_I2C_Expander3.11
NetR481_2: R481.2 U26_SPI_bridge3.13
NetR488_1: R488.1 T36.3 U32.2
NetR543_1: R543.1 X9.3
NetR544_1: R544.1 X9.1
NetR558_I2C_Bridge_2_1: R558_I2C_Bridge_2.1 U3_I2C_Bridge_2.3 U35_I2C_Expander_16.9
NetR561_2: R561.2 R562.2 R563.2 R564.2 U64_U_Pomiar_pradu_napiecia_3.2
NetR565_2: R565.2 R566.2 R567.2 R568.2 U64_U_Pomiar_pradu_napiecia_3.1
NetR569_2: R569.2 R570.2 R571.2 R572.2 U64_U_Pomiar_pradu_napiecia_4.2
NetR573_2: R573.2 R574.2 R575.2 R576.2 U64_U_Pomiar_pradu_napiecia_4.1
NetR577_2: R577.2 R578.2 R579.2 R580.2 U64_U_Pomiar_pradu_napiecia_5.2
NetR581_2: R581.2 R582.2 R583.2 R584.2 U64_U_Pomiar_pradu_napiecia_5.1
NetR585_2: R585.2 R586.2 R587.2 R588.2 U64_U_Pomiar_pradu_napiecia_6.2
NetR589_2: R589.2 R590.2 R591.2 R592.2 U64_U_Pomiar_pradu_napiecia_6.1
NetR595_2: R595.2 R596.2 R597.2 R598.2 U64_U_Pomiar_pradu_napiecia_2.1
NetR599_1: R599.1 U3_I2C_Bridge_2.19 U36_U_Translator_I2C1.6 U36_U_Translator_I2C2.6
NetR600_1: R600.1 R601.2 U58.1
NetR607_1: R607.1 U1.AA13
  other v2: 182.397,300.539
NetR612_1: R612.1 U34.29 | length 8.5
  L1 w0.254: U34.29@64.822,237.639 64.822,237.71 64.831,237.72 v22(64.831,239.097)
  L16 w0.254: v22(59.917,241.89) 59.917,241.114 60.285,240.746 60.915,240.746 61.483,240.178 64.683,240.178 64.831,240.029 v22(64.831,239.097)
NetR614_1: R614.1 U34.12 | length 6.9
  L1 w0.254: R614.1@59.692,230.712 63.088,230.712 64.11,231.734 64.666,231.734 64.815,231.882 64.815,232.984 64.82,232.989 64.82,233.137 U34.12@64.822,233.139
NetR621_1: R621.1 U37.29 | length 1.6
  L1 w0.254: R621.1@65.137,183.369 65.116,183.348 65.116,182.714 65.175,182.655 U37.29@65.175,181.817
NetR622_1: R622.1 U37.12 | length 1.4
  L1 w0.254: R622.1@65.175,175.893 U37.12@65.175,177.317
NetR628_1: R628.1 U38.12 | length 3
  L1 w0.254: v6(63.453,203.556) U38.12@63.453,204.214 ; R628.1@69.132,200.683 v6(69.132,201.631)
  L3 (Sign) w0.254: v6(63.453,203.556) 63.458,203.556 64.457,202.557
NetR644_1: R644.1 R645.2 U69.9
NetR648_2: R648.2 T25.3
NetR650_2: R650.2 T23.1 T24.3
NetR651_1: R651.1 T27.1 T28.3
NetR653_2: R653.2 T30.3
NetR655_1: R655.1 T29.1
NetR657_2: R657.2 T31.3
NetR658_1: R658.1 T31.1
NetR665_2: R665.2 U65.13 | length 2.9
  L1 w0.254: U65.13@38.76,206.158 38.76,207.602 39.014,207.856 R665.2@39.014,208.928
NetR677_1: R677.1 R682.2 U48.6 | length 2.9
  L1 w0.2: R677.1@44.716,192.933 R682.2@45.775,192.933 45.914,192.933 46.214,193.233 U48.6@47.527,193.233
NetR678_1: R678.1 R683.2 U48.5 | length 5.6
  L1 w0.2: R683.2@42.6,192.933 R678.1@43.658,192.933 43.658,193.501 43.89,193.733 U48.5@47.527,193.733
NetR679_1: R679.1 R684.2 U48.3 | length 2.9
  L1 w0.2: R684.2@44.716,195.033 R679.1@45.775,195.033 46.075,194.733 U48.3@47.527,194.733
NetR680_1: R680.1 R685.2 U48.4 | length 5.6
  L1 w0.2: R685.2@42.6,195.033 R680.1@43.658,195.033 43.658,194.466 43.89,194.233 U48.4@47.527,194.233
NetR681_2: R681.2 U48.10 | length 1.4
  L1 w0.2: U48.10@49.827,193.733 50.729,193.733 R681.2@51.105,194.109
NetR686_1: R686.1 U38.29 | length 0.6
  L1 w0.254: U38.29@63.453,208.714 v6@63.453,209.276
  other v6: 63.449,209.276
NetR689_2: R689.2 R690.2 U73.7 | length 10.7
  L1 w0.2: U73.7@151.644,349.484 153.033,349.484 v6(153.035,349.482)
  L1 w0.3: R690.2@159.652,348.062 160.213,348.062 ; v6(160.213,348.729) 160.213,348.062 ; R689.2@160.795,348.062 160.213,348.062
  L3 (Sign) w0.2: v6(153.035,349.482) v6@153.035,349.491
  L3 (Sign) w0.3: v6@153.035,349.491 153.797,348.729 v6(160.213,348.729)
NetR692_1: R692.1 S6.3 S6.4
NetR710_1: R710.1 R711.1 R712.2
NetR711_2: R711.2 U76.4
NetR713_1: R713.1 S7.1 S7.2
NetR714_2: R714.2 S7.3 S7.4
NetR736_1: R736.1 U1.AB13
  other v2: 183.397,300.539
NetR738_1: R738.1 R739.1 U35_I2C_Expander2.13
NetR740_1: R740.1 R741.1 U35_I2C_Expander2.12
NetR742_1: R742.1 R743.1 U35_I2C_Expander2.11
NetR753_1: R753.1 U3_I2C_Bridge.24
NetR754_1: R754.1 U35_I2C_Expander2.14
NetR758_1: R758.1 R759.1
NetR760_1: R760.1 R761.1
NetR762_1: R762.1 R763.1
NetR765_1: R765.1 U1.AE14
  other v2: 186.397,301.539
NetR766_1: R766.1 U1.AE13
  other v2: 186.397,300.539
NetR766_2: R766.2
NetR767_1: R767.1 U1.AC14
  other v2: 184.397,301.539
NetR767_2: R767.2
NetR768_1: R768.1
NetR769_1: R769.1
NetR770_1: R770.1
NetR771_1: R771.1
NetR836_2: R836.2 R838.1 U35_I2C_Expander_16.22
NetR837_2: R837.2 R840.1 U35_I2C_Expander_16.19
NetR839_2: R839.2 R841.1 U35_I2C_Expander_16.17
NetT22_3: T22.3 T23.2
NetT34_4: T34.4 U65.11 | length 14.6
  L1 w0.254: v6(37.846,218.796) 37.85,218.791 T34.4@38.377,218.791 ; U65.11@39.76,206.158 39.76,206.746 v6@40.514,207.5
  L3 (Sign) w0.254: v6(37.846,218.796) 37.846,213.779 40.526,211.099 v6(40.526,207.488)
NetT35_4: T35.4 U65.15 | length 8.6
  L1 w0.254: v6(36.36,212.471) T35.4@36.36,213.464 ; v6(36.71,206.368) 36.92,206.158 U65.15@37.76,206.158
  L3 (Sign) w0.254: v6(36.36,212.471) 36.093,212.204 36.093,206.985 v6(36.71,206.368)
NetTP7_I2C_Bridge_2_1: U3_I2C_Bridge_2.24
NetU1_AF11: U1.AF11
NetU1_AF12: U1.AF12
NetU1_AG11: U1.AG11
  other v2: 188.397,298.539
NetU1_AH11: U1.AH11
NetU1_AH12: U1.AH12
NetU1_AJ1: U1.AJ1
  other v2: 190.397,288.539
NetU1_AJ2: U1.AJ2
  other v2: 190.397,289.539
NetU1_AJ4: U1.AJ4
  other v2: 190.397,291.539
NetU1_AJ10: U1.AJ10
NetU1_AJ11: U1.AJ11
NetU1_AJ12: U1.AJ12
  other v2: 190.397,299.539
NetU1_AK4: U1.AK4
NetU1_AK10: U1.AK10
NetU1_AK11: U1.AK11
NetU1_D9: U1.D9
NetU1_D10: U1.D10
NetU1_G25: U1.G25
NetU1_G26: U1.G26
NetU1_G29: U1.G29
NetU1_G30: U1.G30
NetU1_H27: U1.H27
NetU1_H28: U1.H28
NetU1_J25: U1.J25
NetU1_J26: U1.J26
NetU3_I2C_Bridge_3_19: U3_I2C_Bridge_3.19 U36_U_Translator_I2C3.6 U36_U_Translator_I2C4.6
NetU3_I2C_Bridge_3_20: U3_I2C_Bridge_3.20 U36_U_Translator_I2C3.5 U36_U_Translator_I2C4.5
NetU24_SPI_bridge1_3: U24_SPI_bridge1.3 U25_SPI_bridge1.3 U25_SPI_bridge3.14 U26_SPI_bridge1.3 U27_SPI_bridge1.3 U28_SPI_bridge1.3
NetU24_SPI_bridge1_4: U24_SPI_bridge1.4 U25_SPI_bridge1.4 U25_SPI_bridge3.13 U26_SPI_bridge1.4 U27_SPI_bridge1.4 U28_SPI_bridge1.4
NetU24_SPI_bridge1_5: U24_SPI_bridge1.5 U25_SPI_bridge1.5 U25_SPI_bridge3.12 U26_SPI_bridge1.5 U27_SPI_bridge1.5 U28_SPI_bridge1.5
NetU24_SPI_bridge3_12: U24_SPI_bridge3.12
NetU24_SPI_bridge3_13: U24_SPI_bridge3.13
NetU24_SPI_bridge3_14: U24_SPI_bridge3.14
NetU27_SPI_bridge2_12: U27_SPI_bridge2.12
NetU27_SPI_bridge2_13: U27_SPI_bridge2.13
NetU27_SPI_bridge2_14: U27_SPI_bridge2.14
NetU27_SPI_bridge3_12: U27_SPI_bridge3.12
NetU27_SPI_bridge3_13: U27_SPI_bridge3.13
NetU27_SPI_bridge3_14: U27_SPI_bridge3.14
NetU28_SPI_bridge3_12: U28_SPI_bridge3.12
NetU28_SPI_bridge3_13: U28_SPI_bridge3.13
NetU28_SPI_bridge3_14: U28_SPI_bridge3.14
NetU35_I2C_Expander1_1: U35_I2C_Expander1.1
NetU35_I2C_Expander1_25: U35_I2C_Expander1.25
NetU35_I2C_Expander1_26: U35_I2C_Expander1.26
NetU35_I2C_Expander1_27: U35_I2C_Expander1.27
NetU35_I2C_Expander1_28: U35_I2C_Expander1.28
NetU35_I2C_Expander2_15: U35_I2C_Expander2.15
NetU35_I2C_Expander2_16: U35_I2C_Expander2.16
NetU35_I2C_Expander2_25: U35_I2C_Expander2.25
NetU35_I2C_Expander2_26: U35_I2C_Expander2.26
NetU35_I2C_Expander2_27: U35_I2C_Expander2.27
NetU35_I2C_Expander3_20: U35_I2C_Expander3.20
NetU35_I2C_Expander3_22: U35_I2C_Expander3.22
NetU35_I2C_Expander3_23: U35_I2C_Expander3.23
NetU35_I2C_Expander3_25: U35_I2C_Expander3.25
NetU35_I2C_Expander?_17: 
NetU35_I2C_Expander?_27: 
NetU35_I2C_Expander_10_27: 
NetU35_I2C_Expander_12_14: 
NetU35_I2C_Expander_12_26: 
NetU35_I2C_Expander_12_27: 
NetU35_I2C_Expander_13_2: 
NetU35_I2C_Expander_13_17: 
NetU35_I2C_Expander_13_18: 
NetU35_I2C_Expander_13_20: 
NetU35_I2C_Expander_13_26: 
NetU35_I2C_Expander_13_27: 
NetU35_I2C_Expander_14_17: 
NetU35_I2C_Expander_14_25: 
NetU35_I2C_Expander_14_26: 
NetU35_I2C_Expander_14_27: 
NetU35_I2C_Expander_15_4: 
NetU35_I2C_Expander_15_23: 
NetU35_I2C_Expander_15_24: 
NetU35_I2C_Expander_16_1: U35_I2C_Expander_16.1
NetU35_I2C_Expander_16_4: U35_I2C_Expander_16.4
NetU35_I2C_Expander_16_23: U35_I2C_Expander_16.23
NetU35_I2C_Expander_16_24: U35_I2C_Expander_16.24
NetU35_I2C_Expander_16_25: U35_I2C_Expander_16.25
NetU35_I2C_Expander_16_26: U35_I2C_Expander_16.26
NetU35_I2C_Expander_16_27: U35_I2C_Expander_16.27
NetU35_I2C_Expander_16_28: U35_I2C_Expander_16.28
NetU36_U_Translator_I2C1_8: U36_U_Translator_I2C1.8
NetU36_U_Translator_I2C4_8: U36_U_Translator_I2C4.8
NVME_C_RX_1_N: C718.1 U1.K28 | length 0.7
  L1 w0.116: U1.K28@171.397,315.539 v2(171.884,316.027)
NVME_C_RX_1_P: C717.1 U1.K27 | length 0.7
  L1 w0.116: U1.K27@171.397,314.539 v2(171.884,315.027)
NVME_C_RX_O_N: C677.1 U1.M28 | length 0.7
  L1 w0.116: 172.909,315.052 U1.M28@173.397,315.539
NVME_C_RX_O_P: C653.1 U1.M27 | length 0.7
  L1 w0.116: 172.909,314.052 U1.M27@173.397,314.539
NVME_C_TX_1_N: C716.1 U1.J30 | length 0.7
  L1 w0.116: v1(169.909,318.027) U1.J30@170.397,317.539
NVME_C_TX_1_P: C715.1 U1.J29 | length 0.7
  L1 w0.116: v1(169.909,317.027) U1.J29@170.397,316.539
NVME_C_TX_O_N: C651.1 U1.L30 | length 0.7
  L1 w0.116: v1(171.909,318.027) U1.L30@172.397,317.539
NVME_C_TX_O_P: C649.1 U1.L29 | length 0.7
  L1 w0.116: v1(171.909,317.027) U1.L29@172.397,316.539
NVMe_Rx_0_N: J27.47 R541.1
NVMe_Rx_0_P: J27.49 R541.2
NVMe_Rx_1_N: J27.35 R542.1
NVMe_Rx_1_P: J27.37 R542.2
NVMe_Tx_0_N: J27.41
NVMe_Tx_0_P: J27.43
NVMe_Tx_1_N: J27.29
NVMe_Tx_1_P: J27.31
OSC_500Out: C333.2 X2.10 | length 3.2
  L3 (Sign) w0.254: v25(198.844,270.281) v26(202.019,270.281)
  other v25: 202.019,270.281
  other v26: 198.844,270.281
Osc_in_Si53323_2_N: C343.2 R259.2 R261.2 R489.1 U32.6
Osc_in_Si53323_2_P: C342.2 R260.2 R262.2 R489.2 U32.7
OSC_Out_DIV_N: C343.1 R258.1 U33.11
OSC_Out_DIV_P: C342.1 R256.2 U33.10
PCIE0_CLK_N: J1_PCIE0.53
PCIE0_CLK_P: J1_PCIE0.55
PCIE0_En_DCDC: J1_PCIE0.36
PCIE0_Prsnt1: J1_PCIE0.12
PCIE0_Prsnt2: 
PCIE0_Reset: J1_PCIE0.32
PCIE0_SysRef_FPGA_N: U1.AG10
PCIE0_SysRef_FPGA_P: U1.AF10
PCIE0_SysRef_N: J1_PCIE0.52
PCIE0_SysRef_P: J1_PCIE0.50
PCIE1_CLK_N: J1_PCIE1.53
PCIE1_CLK_P: J1_PCIE1.55
PCIE1_En_DCDC: J1_PCIE1.36
PCIE1_Prsnt1: J1_PCIE1.12
PCIE1_Prsnt2: 
PCIE1_Reset: J1_PCIE1.32
PCIE1_SysRef_FPGA_N: U1.AK8
PCIE1_SysRef_FPGA_P: U1.AK9
PCIE1_SysRef_N: J1_PCIE1.52
PCIE1_SysRef_P: J1_PCIE1.50
PCIE2_CLK_N: J1_PCIE2.53 U14.6
PCIE2_CLK_P: J1_PCIE2.55 U14.7
PCIE2_En_DCDC: J1_PCIE2.36
PCIE2_Prsnt1: J1_PCIE2.12
PCIE2_Prsnt2: 
PCIE2_Reset: J1_PCIE2.32
PCIE2_SysRef_FPGA_N: U1.AJ9 U14.30
PCIE2_SysRef_FPGA_P: U1.AH9 U14.31
PCIE2_SysRef_N: J1_PCIE2.52 U14.3
PCIE2_SysRef_P: J1_PCIE2.50 U14.4
PCIE3_CLK_N: J1_PCIE3.53 U14.15
PCIE3_CLK_P: J1_PCIE3.55 U14.16
PCIE3_En_DCDC: J1_PCIE3.36
PCIE3_Prsnt1: J1_PCIE3.12
PCIE3_Prsnt2: 
PCIE3_Reset: J1_PCIE3.32
PCIE3_SysRef_FPGA_N: U1.AF7 U14.27
PCIE3_SysRef_FPGA_P: U1.AF8 U14.28
  other v2: 187.397,295.539
PCIE3_SysRef_N: J1_PCIE3.52 U14.9
PCIE3_SysRef_P: J1_PCIE3.50 U14.10
PCIE4_CLK_N: J1_PCIE4.53 U14.21
PCIE4_CLK_P: J1_PCIE4.55 U14.22
PCIE4_En_DCDC: J1_PCIE4.36
PCIE4_Prsnt1: J1_PCIE4.12
PCIE4_Prsnt2: 
PCIE4_Reset: J1_PCIE4.32
PCIE4_SysRef_FPGA_N: U1.AE8 U14.24
PCIE4_SysRef_FPGA_P: U1.AE9 U14.25
PCIE4_SysRef_N: J1_PCIE4.52 U14.18
PCIE4_SysRef_P: J1_PCIE4.50 U14.19
PCIe_Reset: R788.1
PDN: R498.2 U16.46
PDN_LMK05028: R499.1
PEDET: J27.61
PERST#: J27.50
PEwake: J27.54
PG1_1: R295.2 R836.1 R839.1 U37.27 | length 2
  L1 w0.254: U37.27@66.175,181.817 66.175,182.406 R295.2@67.169,183.4
PG1_2: R313.2 U38.27 | length 1.8
  L1 w0.254: U38.27@64.453,208.714 64.453,209.276 64.953,209.776 R313.2@64.953,210.304
PG1_TPS7A8801: R440.1 U35_I2C_Expander2.1 U61.17
PG2_2: R314.2 R837.1 U38.14 | length 1.6
  L1 w0.254: U38.14@64.453,204.214 64.455,204.212 64.455,203.6 64.623,203.432 R314.2@64.623,202.723
PG2_TPS7A8801: R441.1 U35_I2C_Expander2.28 U61.9
PG2_TPS7A8801_0V9: R676.1 U37.8 U70.9 U73.5
PG_1V0@1.5A: R834.2 U35_I2C_Expander_16.20 U51.5
PG_1V8@1.5A: R833.2 U35_I2C_Expander_16.21 U50.5
PG_2V5@1.5A: R392.1 U18.A2 U49.5
PG_48_20V: R835.2 U35_I2C_Expander_16.18 U65.19 | length 5
  L1 w0.254: 34.861,200.89 34.861,201.915 R835.2@34.847,201.93 v6(35.674,201.93) ; v6(35.671,203.818) U65.19@36.92,203.818
  L3 (Sign) w0.254: v6(35.671,203.818) 35.671,201.933 v6(35.674,201.93)
PG_DCDC_Low_curr: R832.2 U19.23 U35_I2C_Expander_16.3
PG_LT3042: R442.1 U62.4
PG_PS_LN_5V0_1: U35_I2C_Expander2.4
PG_PS_LTC6952_1: R431_U_5V_to_3V33.1 U35_I2C_Expander2.21 U59_U_5V_to_3V33.5
PG_PS_LTC6952_2: R431_U_5V_to_3V32.1 U35_I2C_Expander2.3 U59_U_5V_to_3V32.5
PG_PS_LTC6952_3: R431_U_5V_to_3V31.1 U35_I2C_Expander2.19 U59_U_5V_to_3V31.5
PG_VTT_RAM: R691.2 U35_I2C_Expander_16.2 U73.6
PGND: C595.1 C596.1 C597.1 C598.1 C694.1 C695.1 C696.1 C697.1 C698.1 C699.1 C700.1 C704.2 D3.2 D4.2 R324.1 R764.2 T35.1 T35.2 T35.3 U65.16 | length 33.5
  L1 w0.5: v1(32.55,212.65) T35.1@32.55,213.464 ; v1(33.82,212.65) T35.2@33.82,213.464 ; v1(35.09,212.65) T35.3@35.09,213.464 ; v1(37.032,210.162) C598.1@37.846,210.162 ; C699.1@51.994,200.664 v1(53.081,200.664) ; C699.1@51.994,201.387 v1(53.081,201.387) ; C696.1@51.994,202.554 v1(53.081,202.554) ; C696.1@51.994,203.278 v1(53.081,203.278) ; C697.1@51.994,204.444 v1(53.081,204.444) ; C697.1@51.994,205.168 v1(53.081,205.168) ; C695.1@51.994,206.335 v1(53.081,206.335) ; C695.1@51.994,207.059 v1(53.081,207.059) ; C698.1@51.994,208.225 v1(53.081,208.225) ; C698.1@51.994,208.949 v1(53.081,208.949)
  L16 w0.5: v5(27.345,227.151) C595.1@28.639,227.151 ; v5(28.639,225.857) C595.1@28.639,227.151 ; v5(29.932,227.151) C595.1@28.639,227.151 ; v5(30.586,223.896) D4.2@31.88,223.896 ; v5(31.88,222.602) D4.2@31.88,223.896 ; v5(31.88,225.19) D4.2@31.88,223.896 ; v5(33.174,223.896) D4.2@31.88,223.896 ; v5(40.454,223.832) D3.2@41.748,223.832 ; v5(41.748,222.539) D3.2@41.748,223.832 ; v5(41.748,225.126) D3.2@41.748,223.832 ; v5(43.041,223.832) D3.2@41.748,223.832 ; v5(48.998,225.107) R324.1@50.292,225.107 v5(50.292,223.813) ; v5(52.54,223.901) C596.1@52.54,225.195 v5(53.834,225.195)
PMU_GPI: J14.7 R784.1
PMU_GPI_1: J14.6 R785.1
PMU_GPI_2: J14.5 R786.1
PMU_GPI_3: J14.4 R787.1
PMU_GPI_5: J14.2 R789.1
PMU_GPO_0: J18.7 R790.1
PMU_GPO_1: J18.6 R791.1
PMU_GPO_2: J18.5 R792.1
PMU_GPO_3: J18.4 R793.1
PMU_GPO_4: J18.3 R794.1
PMU_GPO_5: J18.2 R795.1
Power1_In: P8.1 R448_U_Pomiar_pradu_napiecia_1.1 U64_U_Pomiar_pradu_napiecia_1.10
Power1_In_CM: R12.2 R448_U_Pomiar_pradu_napiecia_1.2 U5.7 U6.C3 U6.D3 U6.D4 U6.E3 U6.E4 U6.F3 U6.F4 U64_U_Pomiar_pradu_napiecia_1.8 U64_U_Pomiar_pradu_napiecia_1.9
  other v5: 46.94,171.336 47.599,172.073 46.939,172.838 48.188,172.838
  other v10: 48.36,174.6
Power2_In: P10.1 R448_U_Pomiar_pradu_napiecia_2.1 U64_U_Pomiar_pradu_napiecia_2.10
Power2_In_CM: R20.2 R448_U_Pomiar_pradu_napiecia_2.2 U5.2 U7.C3 U7.D3 U7.D4 U7.E3 U7.E4 U7.F3 U7.F4 U64_U_Pomiar_pradu_napiecia_2.8 U64_U_Pomiar_pradu_napiecia_2.9
  other v5: 46.939,177.161 48.188,177.161 47.599,177.926 46.94,178.663
  other v10: 48.36,175.4
Power4Charging: U6.C2 U6.D1 U6.D2 U6.E1 U6.E2 U6.F1 U6.F2 U7.C2 U7.D1 U7.D2 U7.E1 U7.E2 U7.F1 U7.F2
Power_3.3_1: C99.2 C100.2 C103.2 C104.2 C107.2 C124.2 C141.2 C145.2 C162.2 C179.2 C572.2 C573.2 FB8.1 FB9.1 FB10.1 FB11.1 FB12.1 FB14.1 FB16.1 FB18.1 FB20.1 FB22.1 R436.2 R440.2 U61.14 U61.15
Power_3.3_2: C108.2 C125.2 C142.2 C146.2 C163.2 C576.2 C577.2 FB13.1 FB15.1 FB17.1 FB19.1 FB21.1 R438.2 R441.2 U61.11 U61.12
Power_MUX_Status0: R13.2 U5.9 U35_I2C_Expander1.21 | length 1.8
  L1 w0.2: U5.9@49.86,174.25 50.769,174.25 50.927,174.091 R13.2@51.6,174.091
Power_MUX_Status1: R11.2 U4.9 U35_I2C_Expander1.20 | length 1.3
  L1 w0.2: U4.9@49.86,183.571 51.101,183.571 R11.2@51.11,183.563
Power_MUX_Status2: R630.2 U35_I2C_Expander1.4 U48.9 | length 1.1
  L1 w0.2: U48.9@49.827,193.233 50.736,193.233 R630.2@50.895,193.075
PS_MODE1: P2.3 R350.1 S1.2 U1.R19 U74.2
  other v2: 176.397,306.539
PS_POR: P3.2 R355.2 U1.N19 U74.1 U76.1 U77.6
  other v2: 174.397,306.539
PS_Reset: P4.1 R354.1 U1.P20 U77.4 U78.6
  other v2: 175.397,307.539
PSIO_VOLTAGE_3V3: U57.15
PWR_ExtIO_nReset: R755.1 U35_I2C_Expander1.14